# Altium PCB Ellis Huber Wearable device_CPU.PcbDoc (part 3 of 3)
Units mm, origin at the board's own origin, x right, y up, seen from the top; angles counter-clockwise.
Board outline 45 x 35 mm, 4 copper layers (Top Layer, Ground, Power, Bottom Layer), stack 1.586 mm thick; 117 components, 85 nets, 387 pads, 159 vias.
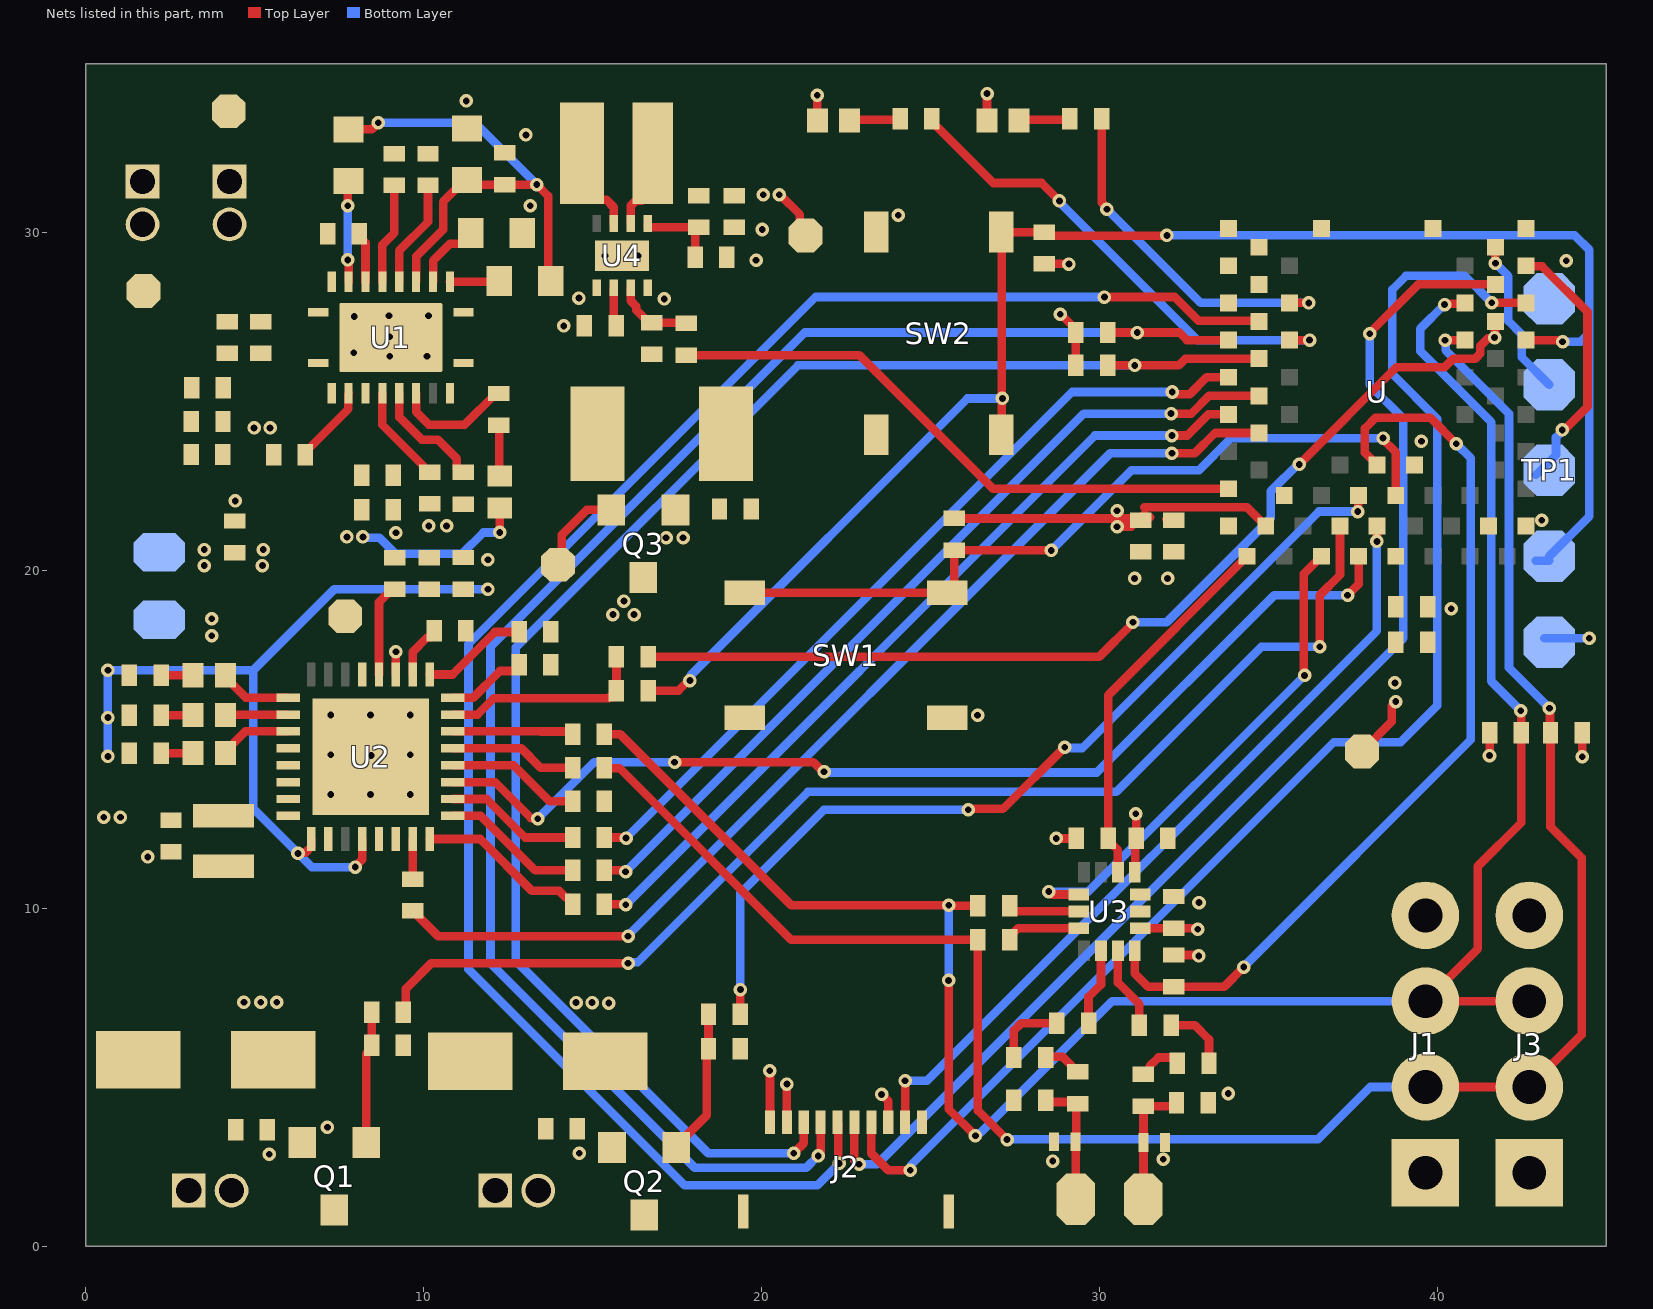
[diagram p4: the nets of this part, all layers, seen from the top]

## Via types
v1: diameter 0.4, hole 0.2, Top Layer to Bottom Layer, tented both sides, 159 vias

## Nets (pads, with @x,y where several pads share a name; then routed paths per layer and width w, separated by ;. In a path a pad name is that pad's centre, name@x,y a point inside that pad or via, vN(x,y) a via of type N, cw(c..) or ccw(c..) an arc to the next point about the centre after c; other vN are vias at no path point)
+3V3: C15.2 C16.2 C17.2 C18.2 C27.2 C28.2 C31.2 J1.1 J2.1 J2.2 J3.1 L1.1 LED5.1 LED6.1 R4.2 R5.2 R6.2 R7.2 R10.2 R19.2 R37.2 R38.2 TP1.1 TP7.1 U2.32 U3.5 U3.8 U.17 U.65 | length 26.9
  Top Layer w0.254: J2.1@20.25,3.675 v1@20.25,5.2 ; J2.2@20.75,3.675 v1(20.75,4.8) ; LED6.1@21.65,33.325 v1(21.65,34.075) ; R10.2@25.7,21.545 31.257,21.545 31.287,21.576 31.5,21.576 31.367,21.442 31.083,21.442 30.941,21.3 v1(30.525,21.3) ; LED5.1@26.675,33.325 v1(26.675,34.125) ; R19.2@28.375,29.08 29.095,29.08 v1(29.1,29.075) ; v1@28.725,12.075 28.729,12.071 R5.2@29.321,12.071 ; v1@28.85,27.6 28.85,27.594 29.305,27.139 R38.2@29.305,27.05 R37.2@29.305,26.075 ; U3.8@31.049,11.072 31.069,11.093 31.069,12.057 C28.2@31.089,12.077 31.089,12.786 v1(31.075,12.8) ; U3.5@31.209,9.412 C27.2@32.196,9.414 ; C17.2@31.287,21.625 C17.2@31.337,21.675 ; 31.337,21.875 34.375,21.875 U.17@34.925,21.325 ; C15.2@31.975,21.52 C15.2@32.027,21.572 ; C27.2@32.196,9.414 32.889,9.414 v1@32.9,9.425 ; R4.2@32.2,8.622 32.922,8.622 v1@32.925,8.625 ; TP7.1@37.775,14.65 38.652,15.527 38.652,16.002 v1(38.775,16.125) ; v1(41.55,14.525) 41.555,14.53 R7.2@41.555,15.2 ; R6.2@44.295,15.2 44.295,14.505 v1@44.3,14.5
  Bottom Layer w0.254: TP1.1@43.17,18 v1(44.5,18)
  other v1: 20.246,5.196 32.943,8.594 32.911,9.385 28.727,12.073 0.525,12.7 1.019,12.703 44.298,14.491 38.75,16.675 30.525,21.776 28.841,27.59
BAT+: C30.2 Q3.3 TP3.1 U2.19 | length 0.7
  Top Layer w0.254: U2.19@9.175,16.925 v1(9.175,17.6)
  other v1: 15.6,18.7 16.225,18.7 15.925,19.1 3.5,20.15 5.225,20.15 3.5,20.625 5.25,20.625
CHG: R22.1 U1.7 | length 3.5
  Top Layer w0.254: U1.7@9.775,25.25 9.775,24.7 10.15,24.325 11.216,24.325 12.136,25.245 R22.1@12.225,25.245
GND: C4.1 C5.1 C13.1 C15.1 C16.1 C17.1 C18.1 C19.1 C20.1 C21.1 C22.1 C23.1 C24.1 C25.1 C26.1 C27.1 C28.1 C29.1 C30.1 C31.1 C32.1 CR1.1 CR2.1 J1.4 J2.10 J2.S1 J2.S2 J3.4 Q1.2 Q2.2 R3.1 R9.1 R13.1 R14.1 R16.1 R27.1 R39.1 R40.2 R41.1 R42.1 SW1.1 SW1.2 SW2.1 SW2.2 TP1.5 TP3.2 U1.1 U1.9 U1.10 U1.11 U1.20 U1.21 U2.2 U2.6 U2.28 U2.29 U2.30 U2.31 U2.33 U3.6 U3.7 U4.1 U4.4 U4.9 U.1 U.2 U.3 U.4 U.5 U.16 U.18 U.29 U.30 U.45 U.46 U.47 U.55
  other v1: 28.617,2.522 31.892,2.572 5.425,2.725 14.6,2.75 7.15,3.525 33.817,4.522 32.95,10.175 1.831,11.525 7.25,13.375 8.425,13.375 9.6,13.375 8.443,14.528 7.25,14.55 9.6,14.55 7.25,15.725 8.425,15.725 9.6,15.725 26.393,15.719 3.725,18.075 3.725,18.575 40.419,18.869 31.044,19.769 32.019,19.769 11.9,20.325 9.175,21.125 43.093,21.494 4.42,22.065 39.536,23.828 8.992,26.347 10.092,26.347 7.925,26.45 8.993,26.922 14.143,27.244 7.942,27.522 8.967,27.547 10.142,27.547 17.118,28.044 14.593,28.069 19.837,29.191 43.823,29.176 15.368,29.319 16.343,29.319 20.023,30.099 24.043,30.519 13.15,30.8 13.025,32.9 11.261,33.907
IMU2_CS: J2.5 U.6 | length 52.7
  Top Layer w0.254: J2.5@22.25,3.675 22.273,3.652 22.273,2.477 v1(22.3,2.45) ; v1(30.15,28.1) 32.235,28.1 32.935,27.4 34.7,27.4 U.6@34.725,27.375
  Bottom Layer w0.254: v1(22.3,2.45) 21.65,1.8 17.725,1.8 11.325,8.2 11.325,17.825 21.6,28.1 v1(30.15,28.1)
IMU2_INT1: J2.7 U.41 | length 41
  Top Layer w0.254: J2.7@23.25,3.675 23.25,2.75 23.75,2.25 v1(24.4,2.25) ; v1(41.617,27.931) 41.62,27.928 42.622,27.928 U.41@42.625,27.925
  Bottom Layer w0.254: v1(24.4,2.25) 24.428,2.278 24.428,2.407 36.946,14.925 38.925,14.925 40,16 40,24.5 38.675,25.825 38.675,28.327 39.074,28.727 40.821,28.727 v1(41.617,27.931)
IMU2_INT2: J2.6 U.42 | length 37.7
  Top Layer w0.254: J2.6@22.75,3.675 22.75,2.525 v1@22.9,2.375 ; v1@38.002,27.034 39.442,28.475 U.42@41.725,28.475
  Bottom Layer w0.254: v1(22.887,2.427) 23.427,2.427 39,18 39,24.5 38,25.5 v1@38,27
  other v1: 38.002,27.014
IMU2_SCL: J2.3 R37.1 U.8 | length 47.3
  Top Layer w0.254: v1(20.95,2.75) 21.25,3.05 J2.3@21.25,3.675 ; R37.1@30.245,26.075 32.35,26.075 32.55,26.275 U.8@34.725,26.275
  Bottom Layer w0.254: v1(20.95,2.75) 18.425,2.75 12.725,8.45 12.725,17.725 21.075,26.075 v1(31.05,26.075)
IMU2_SDA: J2.4 R38.1 U.7 | length 49.4
  Top Layer w0.254: v1(21.675,2.675) 21.675,2.715 21.75,2.79 J2.4@21.75,3.675 ; R38.1@30.245,27.05 32.37,27.05 32.595,26.825 U.7@33.825,26.825
  Bottom Layer w0.254: v1(21.675,2.675) 21.325,2.325 18.025,2.325 11.975,8.375 11.975,17.745 21.28,27.05 v1(31.125,27.05)
LED1: R23.2 U.49 | length 10.4
  Top Layer w0.254: R23.2@30.07,33.375 30.07,30.895 30.225,30.74 v1(30.225,30.7) ; U.49@35.625,27.925 v1(36.2,27.925)
  Bottom Layer w0.254: v1(30.225,30.7) 33,27.925 v1(36.2,27.925)
LED2: R24.2 U.50 | length 14.5
  Top Layer w0.254: R24.2@25.045,33.376 25.045,33.287 26.857,31.475 28.288,31.475 v1(28.819,30.944) ; U.50@35.625,26.825 v1(36.225,26.825)
  Bottom Layer w0.254: v1@28.85,30.875 32.9,26.825 v1(36.225,26.825)
MC3: J2.9 U.23 | length 23.8
  Top Layer w0.254: J2.9@24.25,3.675 v1(24.25,4.9) ; v1(38.217,20.863) 38.221,20.868 38.221,21.321 U.23@38.225,21.325
  Bottom Layer w0.254: v1(24.25,4.9) 24.9,4.9 38.217,18.217 v1(38.217,20.863)
NetC1_1: C1.1 C2.2 C3.1 C6.2 C7.1 C8.2 C9.2 C10.2 U1.2
  other v1: 10.15,21.325 10.675,21.325 4.975,24.225 5.45,24.225
NetC1_2: C1.2 U1.5 | length 3
  Top Layer w0.254: U1.5@8.775,25.25 8.775,24.316 9.99,23.1 9.99,23.016 10.092,22.915 C1.2@10.181,22.915
NetC2_1: C2.1 C6.1 C8.1 J4.2 J5.2 TP5.1
NetC3_2: C3.2 U1.6 | length 3.4
  Top Layer w0.254: U1.6@9.275,25.25 9.275,24.548 9.948,23.875 10.419,23.875 10.976,23.318 10.976,23.013 11.077,22.912 C3.2@11.166,22.912
NetC7_2: C7.2 U1.3 | length 2.4
  Top Layer w0.254: C7.2@6.495,23.425 6.495,23.514 7.768,24.787 7.768,25.243 U1.3@7.775,25.25
NetC9_1: C9.1 C10.1 C11.1 C12.1 C14.1 J4.1 J5.1 TP6.1 U1.19
NetC11_2: C11.2 U1.17 | length 1.5
  Top Layer w0.254: C11.2@8.095,29.975 8.095,29.886 8.275,29.706 U1.17@8.275,28.55
NetC12_2: C12.2 U1.15 | length 3.2
  Top Layer w0.254: U1.15@9.275,28.55 9.275,29.475 10.125,30.325 C12.2@10.125,31.405
NetC13_2: C13.2 R1.1 R12.1 R16.2 U1.14 | length 15.2
  Top Layer w0.254: R12.1@7.775,33.062 8.462,33.062 v1@8.65,33.25 ; U1.14@9.775,28.55 9.775,29.3 10.575,30.1 10.575,30.926 11.212,31.563 R16.2@11.275,31.563 11.408,31.43 C13.2@12.4,31.43 v1(13.345,31.43) 13.682,31.093 13.682,28.655 R1.1@13.762,28.575
  Bottom Layer w0.254: v1(8.656,33.259) 11.516,33.259 v1(13.345,31.43)
NetC14_2: C14.2 U1.16 | length 3
  Top Layer w0.254: U1.16@8.775,28.55 8.775,29.65 9.125,30 C14.2@9.125,31.405
NetC20_2: C20.2 CR1.2 R15.1 TP2.2 | length 3.9
  Top Layer w0.254: C20.2@28.41,4.318 28.458,4.27 29.313,4.27 R15.1@29.362,4.222 29.319,4.179 29.319,3.119 CR1.2@29.293,3.093 29.299,3.088 29.299,1.395 TP2.2@29.304,1.389 ; TP2.2@29.346,2.004 TP2.2@29.35,2
NetC21_2: C21.2 CR2.2 R29.1 TP2.1 | length 3.8
  Top Layer w0.254: TP2.1@31.304,1.389 31.306,1.391 31.306,3.066 CR2.2@31.308,3.068 31.306,3.07 31.306,4.145 R29.1@31.304,4.147 32.183,4.147 C21.2@32.284,4.249 ; TP2.1@31.35,2 TP2.1@31.354,2.004
NetC23_2: C23.2 D4.1 Q3.2 TP8.1 U4.2 | length 3.8
  Top Layer w0.254: TP8.1@13.975,20.175 14.085,20.285 14.085,21.056 14.829,21.8 Q3.2@15.55,21.8 ; C23.2@15.62,27.25 15.623,27.253 15.623,28.373 U4.2@15.625,28.375
NetC32_2: C32.2 U2.12 | length 4
  Top Layer w0.254: U2.12@10.86,14.24 12.66,14.24 13.725,13.175 C32.2@14.405,13.175
NetD1_2: D1.2 J7.1 Q1.3
NetD2_2: D2.2 J6.1 Q2.3
NetL1_2: L1.2 U2.5
NetL2_1: L2.1 U4.7 | length 2.6
  Top Layer w0.254: L2.1@14.679,32.358 14.679,31.508 15.202,30.985 15.4,30.985 15.625,30.76 U4.7@15.625,30.275
NetLED1_1: LED1.1 R31.1 | length 1
  Top Layer w0.254: R31.1@2.225,16.9 LED1.1@3.175,16.9
NetLED1_2: LED1.2 U2.25 | length 2.2
  Top Layer w0.254: LED1.2@4.125,16.9 4.125,16.85 4.735,16.24 U2.25@5.99,16.24
NetLED2_1: LED2.1 R32.1 | length 1
  Top Layer w0.254: R32.1@2.225,15.725 LED2.1@3.175,15.725
NetLED2_2: LED2.2 U2.26 | length 1.9
  Top Layer w0.254: LED2.2@4.125,15.725 4.138,15.738 5.988,15.738 U2.26@5.99,15.74
NetLED3_1: LED3.1 R33.1 | length 1
  Top Layer w0.254: R33.1@2.225,14.6 LED3.1@3.175,14.6
NetLED3_2: LED3.2 U2.27 | length 2.2
  Top Layer w0.254: LED3.2@4.125,14.6 4.125,14.65 4.715,15.24 U2.27@5.99,15.24
NetLED5_2: LED5.2 R23.1 | length 1.5
  Top Layer w0.254: LED5.2@27.625,33.325 27.65,33.35 29.105,33.35 R23.1@29.13,33.375
NetLED6_2: LED6.2 R24.1 | length 1.5
  Top Layer w0.254: LED6.2@22.6,33.325 22.625,33.35 24.08,33.35 R24.1@24.105,33.376
NetLED7_2: LED7.2 R22.2 | length 1.5
  Top Layer w0.254: R22.2@12.225,24.305 12.238,24.293 12.238,22.813 LED7.2@12.25,22.8
NetQ1_1: Q1.1 R8.1 R9.2 | length 3.9
  Top Layer w0.254: Q1.1@8.3,3.075 8.3,5.703 8.455,5.859 R9.2@8.455,5.948 R8.1@8.455,6.923
NetQ2_1: Q2.1 R2.1 R3.2 | length 4.3
  Top Layer w0.254: Q2.1@17.475,2.925 17.475,2.975 18.375,3.875 18.375,5.795 R3.2@18.43,5.85 R2.1@18.43,6.87
NetR1_2: R1.2 U1.12 | length 1.5
  Top Layer w0.254: U1.12@10.775,28.55 12.213,28.55 R1.2@12.238,28.575
NetR2_2: R2.2 U.22 | length 27
  Top Layer w0.254: R2.2@19.37,6.87 19.372,6.873 19.372,7.597 v1(19.375,7.6) ; v1(26.119,12.919) 26.147,12.947 27.147,12.947 v1(28.975,14.775) ; v1(37.65,21.75) 37.663,21.762 37.663,22.212 U.22@37.675,22.225
  Bottom Layer w0.254: v1(19.375,7.6) 19.375,10.45 21.844,12.919 v1(26.119,12.919) ; v1(28.975,14.775) 29,14.75 29.5,14.75 36.5,21.75 v1(37.65,21.75)
NetR4_1: R4.1 U3.4 U.54 | length 27.2
  Top Layer w0.254: U3.4@31.049,8.752 31.049,8.076 31.442,7.683 R4.1@32.2,7.683 33.695,7.683 v1(34.276,8.263) ; U.54@38.225,23.125 37.861,23.489 37.861,24.211 38.175,24.525 39.8,24.525 v1@40.575,23.75
  Bottom Layer w0.254: v1@34.275,8.275 41,15 41,23.327 v1(40.569,23.758)
NetR5_1: R5.1 U3.9 U.61 | length 11.2
  Top Layer w0.254: U3.9@30.549,11.072 30.549,11.732 30.4,11.881 30.362,11.881 30.26,11.983 R5.1@30.26,12.071 30.26,16.31 U.61@34.375,20.425
NetR8_2: R8.2 U.21 | length 35.8
  Top Layer w0.254: R8.2@9.395,6.923 9.471,6.998 9.471,7.621 10.225,8.375 v1(16.05,8.375) ; v1(36.525,17.75) 36.525,19.275 37.125,19.875 U.21@37.125,21.325 U.21@37.135,21.315
  Bottom Layer w0.254: v1(16.05,8.375) 16.078,8.403 16.328,8.403 21.375,13.45 30.5,13.45 34.8,17.75 v1(36.525,17.75)
NetR10_1: R10.1 SW1.3 SW1.4 U.24 | length 23.3
  Top Layer w0.254: SW1.4@19.5,19.35 SW1.3@25.5,19.35 25.7,19.55 R10.1@25.7,20.605 25.703,20.603 28.572,20.603 v1(28.575,20.6) ; v1(38.4,23.925) 38.4,23.885 38.775,23.51 U.24@38.775,22.225
  Bottom Layer w0.254: v1(28.575,20.6) 30.95,22.975 32.95,22.975 33.9,23.925 v1(38.4,23.925)
NetR11_1: R11.1 U.40 | length 30
  Top Layer w0.254: R11.1@16.645,17.45 30,17.45 v1@31,18.45 ; v1(35.918,23.144) 38.799,26.025 40.225,26.025 40.475,26.275 41.125,26.275 41.275,26.425 41.275,26.65 41.497,26.872 41.672,26.872 v1(41.7,26.9) 41.712,26.912 41.712,27.362 U.40@41.725,27.375
  Bottom Layer w0.254: v1(30.993,18.469) 31.994,18.469 35.075,21.55 35.075,22.35 v1@35.9,23.175
NetR12_2: R12.2 U1.18 | length 3
  Top Layer w0.254: v1(7.749,30.801) 7.749,31.512 R12.2@7.775,31.538 ; v1(7.75,29.2) 7.775,29.175 U1.18@7.775,28.55
  Bottom Layer w0.254: v1(7.75,29.2) v1(7.749,30.801)
NetR13_2: R13.2 U1.13 | length 2.1
  Top Layer w0.254: U1.13@10.275,28.55 10.275,29.175 10.783,29.683 11.134,29.683 11.388,29.937 R13.2@11.388,30
NetR14_2: R14.2 U2.16 | length 2.4
  Top Layer w0.254: U2.16@10.86,16.24 11.465,16.24 12.254,17.029 12.721,17.029 12.823,17.13 R14.2@12.823,17.219
NetR15_2: R15.2 R20.1 | length 1.2
  Top Layer w0.254: R20.1@28.427,5.605 28.918,5.605 29.171,5.352 29.171,5.263 29.273,5.162 R15.2@29.362,5.162
NetR17_1: R17.1 U.12 | length 31.5
  Top Layer w0.254: R17.1@9.675,9.93 10.43,9.175 v1(16.05,9.175) ; v1(32.15,23.475) 32.825,23.475 33.425,24.075 U.12@34.725,24.075
  Bottom Layer w0.254: v1(16.05,9.175) 16.05,9.2 30.325,23.475 v1(32.15,23.475)
NetR17_2: R17.2 U2.7 | length 1.2
  Top Layer w0.254: R17.2@9.675,10.87 U2.7@9.675,12.055
NetR18_1: R18.1 U.11 | length 24.5
  Top Layer w0.254: R18.1@15.345,10.125 v1@15.975,10.125 ; v1(32.15,24) 32.6,24 33.225,24.625 U.11@33.825,24.625
  Bottom Layer w0.254: v1(15.979,10.11) 29.869,24 v1(32.15,24)
NetR18_2: R18.2 U2.8 | length 5.1
  Top Layer w0.254: U2.8@10.175,12.055 11.67,12.055 13.2,10.525 14.005,10.525 14.215,10.316 14.304,10.316 14.405,10.214 R18.2@14.405,10.125
NetR20_2: R20.2 R28.1 | length 2.2
  Top Layer w0.254: R20.2@27.47,5.588 27.47,6.388 27.686,6.604 R28.1@28.74,6.604
NetR21_1: R21.1 R39.2 U4.5 | length 2.6
  Top Layer w0.254: U4.5@16.625,30.275 16.625,30.164 16.627,30.162 R21.1@18.134,30.162 ; R39.2@18.032,29.279 18.032,30.061 R21.1@18.134,30.162 ; R21.1@18.138,30.162 R21.1@18.134,30.162
NetR26_1: R26.1 U.10 | length 25.2
  Top Layer w0.254: R26.1@15.345,11.125 15.95,11.125 v1@15.975,11.1 ; v1(32.125,24.65) 32.725,24.65 33.25,25.175 U.10@34.725,25.175
  Bottom Layer w0.254: v1(15.975,11.084) 29.541,24.65 v1(32.125,24.65)
NetR26_2: R26.2 U2.9 | length 4.2
  Top Layer w0.254: U2.9@10.86,12.74 11.685,12.74 13.3,11.125 R26.2@14.38,11.125
NetR28_2: R28.2 U3.2 | length 2.3
  Top Layer w0.254: R28.2@29.68,6.604 29.68,7.38 30.049,7.749 U3.2@30.049,8.752
NetR29_2: R29.2 R45.1 | length 1.4
  Top Layer w0.254: R29.2@31.304,5.087 31.393,5.087 31.495,5.188 31.495,5.333 31.75,5.588 32.205,5.588 32.307,5.486 R45.1@32.307,5.417
NetR30_1: R30.1 U.15 | length 17.7
  Top Layer w0.254: R30.1@17.77,26.381 22.895,26.381 26.851,22.425 U.15@33.825,22.425
NetR30_2: R30.2 R40.1 U4.3 | length 2.4
  Top Layer w0.254: U4.3@16.125,28.375 16.127,28.373 16.127,27.989 16.293,27.822 16.293,27.713 16.661,27.345 R40.1@16.75,27.345 ; R40.1@16.762,27.333 17.758,27.333 R30.2@17.77,27.321
NetR34_2: R34.2 U2.14 | length 3.6
  Top Layer w0.254: U2.14@10.86,15.24 13.46,15.24 13.463,15.237 14.32,15.237 R34.2@14.398,15.16
NetR35_2: R35.2 U2.13 | length 3.8
  Top Layer w0.254: U2.13@10.86,14.74 12.885,14.74 13.458,14.167 R35.2@14.398,14.167
NetR36_1: R36.1 U.9 | length 24.1
  Top Layer w0.254: R36.1@15.345,12.1 v1@16,12.1 ; v1@32.2,25.225 32.675,25.225 33.175,25.725 U.9@33.825,25.725
  Bottom Layer w0.254: v1(15.988,12.084) 29.193,25.289 v1(32.158,25.289)
NetR36_2: R36.2 U2.10 | length 4
  Top Layer w0.254: U2.10@10.86,13.24 11.86,13.24 13,12.1 R36.2@14.38,12.1
NetR41_2: R41.2 U2.18 | length 1.6
  Top Layer w0.254: U2.18@9.675,16.925 9.675,17.595 10.115,18.035 10.203,18.035 10.305,18.136 R41.2@10.305,18.225
NetR42_2: R42.2 U2.17 | length 3.2
  Top Layer w0.254: U2.17@10.175,16.925 10.85,16.925 12.11,18.185 R42.2@12.823,18.185
NetR43_2: R43.2 U3.14 | length 2.2
  Top Layer w0.254: R43.2@27.345,9.075 27.345,9.164 27.593,9.412 U3.14@29.389,9.412
NetR44_2: R44.2 U3.13 | length 2.1
  Top Layer w0.254: R44.2@27.345,10.075 27.345,10.014 27.447,9.912 U3.13@29.389,9.912
NetR45_2: R45.2 R46.1 | length 2
  Top Layer w0.254: R46.1@32.127,6.542 32.828,6.542 33.247,6.123 R45.2@33.247,5.417
NetR46_2: R46.2 U3.3 | length 2.5
  Top Layer w0.254: U3.3@30.549,8.752 30.549,7.805 31.187,7.167 R46.2@31.187,6.542
NetTP1_3: TP1.3 U.43 | length 7.9
  Top Layer w0.254: U.43@42.625,29.025 42.642,29.008 43.107,29.008 44.45,27.665 44.45,24.85 v1@43.725,24.125
  Bottom Layer w0.254: TP1.3@42.925,22.835 43.518,23.428 43.518,23.941 43.704,24.127 v1(43.704,24.167)
NetTP1_4: TP1.4 U.44 | length 4.7
  Top Layer w0.254: v1(41.725,29.1) U.44@41.725,29.575
  Bottom Layer w0.254: v1(41.725,29.1) 42.111,28.714 42.111,27.389 42.5,27 42.5,26.325 TP1.4@43.32,25.505
NetU2_11: U2.11 U.64 | length 31.2
  Top Layer w0.254: U2.11@10.86,13.74 12.11,13.74 13.175,12.675 v1@13.375,12.675 ; v1(17.425,14.325) 21.535,14.325 21.81,14.05 v1(21.85,14.05) ; v1(37.35,19.275) 37.675,19.6 U.64@37.675,20.425
  Bottom Layer w0.254: v1(13.375,12.659) 15.041,14.325 v1(17.425,14.325) ; v1(21.85,14.05) 21.875,14.025 29.925,14.025 35.175,19.275 v1(37.35,19.275)
NetU3_12: U3.12 U.63 | length 14.9
  Top Layer w0.254: v1(28.5,10.5) 28.54,10.5 28.627,10.412 U3.12@29.389,10.412 ; v1(36.074,16.899) 36.05,16.923 36.05,19.9 U.63@36.575,20.425
  Bottom Layer w0.254: v1(28.5,10.5) 29.675,10.5 v1(36.074,16.899)
NPM_RST: R11.2 R25.1 U2.15 | length 6.2
  Top Layer w0.254: U2.15@10.86,15.74 11.59,15.74 12.077,16.227 15.482,16.227 15.515,16.259 15.604,16.259 15.705,16.361 R25.1@15.705,16.45 R11.2@15.705,17.45
RST: R19.1 R25.2 SW2.3 SW2.4 TP1.2 U.39 | length 49.7
  Top Layer w0.254: R25.2@16.645,16.45 17.544,16.45 17.839,16.745 v1(17.879,16.745) ; SW2.3@27.1,24.025 27.116,24.041 27.116,25.081 v1(27.132,25.097) 27.116,25.113 27.116,30.009 SW2.4@27.105,30.02 ; SW2.4@27.1,30.025 SW2.4@27.105,30.02 ; v1(32,29.925) 31.993,29.918 28.477,29.918 R19.1@28.375,30.02 SW2.4@27.105,30.02 ; U.39@42.625,26.825 43.624,26.825 43.673,26.777 v1(43.712,26.777)
  Bottom Layer w0.254: v1(17.879,16.745) 17.907,16.773 17.907,16.907 26.097,25.097 v1(27.132,25.097) ; v1(32,29.925) 44.075,29.925 44.5,29.5 44.5,27.028 ; TP1.2@42.925,20.295 TP1.2@43.32,20.295 ; TP1.2@43.32,20.425 44.5,21.605 44.5,27.028 ; v1(43.712,26.777) 44.248,26.777 44.5,27.028
SCL: J1.3 J3.3 R7.1 R34.1 R44.1 U.59 | length 62.3
  Top Layer w0.254: R34.1@15.345,15.16 15.815,15.16 20.881,10.094 v1(25.543,10.094) ; v1(25.538,7.868) 25.538,4.064 v1(26.333,3.269) ; v1@25.543,10.075 R44.1@26.405,10.075 ; v1(40.221,27.879) 40.244,27.902 40.802,27.902 U.59@40.825,27.925 ; v1(42.475,15.85) 42.485,15.84 42.485,15.21 R7.1@42.495,15.2 42.495,12.545 41.2,11.25 41.2,8.802 J1.3@39.653,7.255 J3.3@42.727,7.255
  Bottom Layer w0.254: v1(25.543,10.094) 25.543,7.882 v1@25.55,7.875 ; v1(26.333,3.269) 26.373,3.269 26.446,3.342 26.463,3.342 30.376,7.255 J1.3@39.653,7.255 ; v1(40.221,27.879) 39.5,27.158 39.5,26.5 41.601,24.399 41.601,16.724 v1(42.475,15.85)
SDA: J1.2 J3.2 R6.1 R35.1 R43.1 U.58 | length 60.6
  Top Layer w0.254: R35.1@15.345,14.167 15.423,14.167 15.447,14.144 15.806,14.144 20.875,9.075 R43.1@26.405,9.075 26.405,4.019 v1(27.267,3.157) ; J1.2@39.653,4.715 J3.2@42.727,4.715 44.275,6.263 44.275,11.5 43.355,12.42 R6.1@43.355,15.2 43.34,15.215 43.34,15.91 v1(43.325,15.925) ; v1(40.235,26.824) U.58@40.825,26.825
  Bottom Layer w0.254: v1@27.276,3.166 36.472,3.166 38.021,4.715 J1.2@39.653,4.715 ; v1(40.235,26.824) 40.249,26.81 40.249,26.525 42.126,24.648 42.126,17.124 v1(43.325,15.925)
VOS: C19.2 C22.2 C29.2 D1.1 D2.1 J2.8 J6.2 J7.2 L2.2 R21.2 TP9.1 U4.6 | length 4.9
  Top Layer w0.254: U4.6@16.125,30.275 16.125,30.803 16.274,30.952 16.452,30.952 16.779,31.279 L2.2@16.779,32.358 ; v1(20.522,31.127) 20.548,31.127 21.135,30.54 21.135,30.09 TP9.1@21.3,29.925 ; v1@23.525,4.525 23.75,4.3 J2.8@23.75,3.675
  other v1: 23.552,4.495 15.475,7.2 4.675,7.225 5.175,7.225 5.65,7.225 14.509,7.212 14.984,7.212 20.047,31.127
VSYS: C24.2 C25.2 C26.2 R31.2 R32.2 R33.2 U2.1 U2.4 U2.20 | length 27
  Top Layer w0.254: v1@6.25,11.65 6.491,11.65 6.675,11.834 U2.1@6.675,12.055 ; v1(7.975,11.225) 7.975,11.241 8.175,11.441 U2.4@8.175,12.055 ; U2.20@8.675,16.925 8.675,19.065 9.054,19.444 C24.2@9.143,19.444
  Bottom Layer w0.254: v1(0.65,14.5) v1(0.65,15.65) v1(0.65,17.05) 4.95,17.05 ; v1@7.961,11.225 6.681,11.225 4.95,12.956 4.95,17.05 ; v1(11.9,19.45) 7.35,19.45 4.95,17.05
  other v1: 6.277,11.629
W_Power: C4.2 C5.2 D4.2 LED7.1 Q3.1 R27.2 TP4.1 U1.4 U2.21 | length 5.2
  Top Layer w0.254: v1(12.25,21.131) LED7.1@12.25,21.85
  Bottom Layer w0.254: v1(8.2,21) 8.228,20.972 8.686,20.972 9.158,20.5 11.136,20.5 11.767,21.131 v1(12.25,21.131)
  other v1: 17.175,20.975 17.675,20.975 7.725,21
pads on no net: U1.8 U2.3 U2.22 U2.23 U2.24 U3.1 U3.10 U3.11 U4.8 U.13 U.14 U.19 U.20 U.25 U.26 U.27 U.28 U.31 U.32 U.33 U.34 U.35 U.36 U.37 U.38 U.48 U.51 U.52 U.53 U.56 U.57 U.60 U.62 U.66 U.67 U.68

## Polygon pours and split planes (outlines as drawn)
GND on Top Layer "NONET_L-01_P-001" (solid, pour order 21): 0,0 0,0.001 0,35 45,35 45,0
VOS on Top Layer "NONET_L-01_P-001" (solid, pour order 17): 3.75,1.178 4.825,1.178 4.825,2.725 4.65,2.9 4.65,4.25 4.725,4.325 6.804,4.325 7.175,4.696 7.175,7.25 6.875,7.55 4.5,7.55 4.15,7.2 4.15,4.875 4.15,3.004 3.75,2.7
VOS on Top Layer "NONET_L-01_P-001" (solid, pour order 16): 13.4,1.15 13.403,1.153 14.025,1.153 14.025,2.325 13.829,2.521 13.829,4.054 14.075,4.3 16.604,4.3 16.975,4.671 16.975,7.225 16.675,7.525 14.3,7.525 14,7.225 14,4.9 13.375,4.275 13.375,2.525 13.186,2.376 12.875,2.163 12.875,1.15 13.35,1.15
W_Power on Top Layer "NONET_L-01_P-001" (solid, pour order 10): 16.75,22.425 16.975,22.65 18.05,22.65 18.05,25.7 20.025,25.7 20.025,22.775 19.75,22.5 18.975,22.5 18.975,20.95 18.775,20.75 16.975,20.75 16.75,20.975
NetL1_2 on Top Layer "NONET_L-01_P-001" (solid, pour order 7): 3.175,11.597 3.175,10.45 3.375,10.25 8.375,10.25 8.798,10.673 8.798,12.404 8.797,12.405 8.551,12.405 8.551,11.126 8.15,10.725 5.835,10.725 4.96,11.6 3.178,11.6 3.175,11.597
+3V3 on Top Layer "NONET_L-01_P-001" (solid, pour order 6): 6.333,12.865 5.765,12.865 5.2,12.86 4.96,13.1 0.35,13.1 0.15,12.9 0.15,12.475 0.35,12.275 4.85,12.275 5.2,12.615 5.21,12.615 6.339,12.615 6.341,12.617 6.341,12.865
W_Power on Top Layer "NONET_L-01_P-001" (solid, pour order 4): 8.298,16.573 8.301,16.576 8.301,20.493 8.389,20.581 8.4,20.592 8.4,21 7.125,21 7.125,18.3 8.05,17.375 8.05,16.576 8.05,16.575 8.053,16.572 8.298,16.572
W_Power on Top Layer "NONET_L-01_P-001" (solid, pour order 3): 8.153,25.551 8.394,25.551 8.395,25.552 8.4,25.547 8.4,20.65 8.35,20.6 7.6,20.6 7.475,20.725 7.476,20.726 7.476,23.906 7.486,23.906 8.154,24.574 8.154,25.376 8.155,25.377
NetC9_1 on Top Layer "NONET_L-01_P-001" (solid, pour order 2): 8.797,32.116 10.444,32.116 10.425,32.136 10.425,34.575 10.275,34.725 4.325,34.725 4.175,34.575 4.175,34.15 4.3,34.025 9.475,34.025 9.8,33.7 9.8,32.575 8.8,32.575 8.797,32.572
NetC2_1 on Top Layer "NONET_L-01_P-001" (solid, pour order 1): 1.675,30.75 4.8,30.75 4.925,30.625 4.925,29.175 4.75,29 3.5,29 3.05,28.55 3.05,26.125 3.375,25.8 3.375,22.875 3.325,22.825 0.45,22.825 0.275,23 0.275,30.625 0.4,30.75 1.675,30.75
NetC9_1 on Top Layer "NONET_L-01_P-001" (solid, pour order 0): 1.31,31.019 0.481,31.019 0.25,31.25 0.25,34.5 0.6,34.85 5.975,34.85 6.4,34.425 6.4,30.525 6.626,30.299 7.383,30.299 7.383,29.645 7.383,29.644 6.897,29.644 6.897,28.928 6.979,28.846 7.389,28.846 7.389,28.25 7.388,28.248 5.698,28.248 5.5,28.05 5.5,27.125 3.625,27.125 3.625,28.357 3.868,28.6 5.2,28.6 5.375,28.775 5.375,30.85 5.2,31.025 5.194,31.019
W_Power on Power "NONET_L-01_P-001" (solid, pour order 22): 17.955,20.75 17.957,20.752 17.957,23.049 17.93,23.076 17.93,23.075 7.475,23.075 7.475,20.15 7.75,19.875 13.225,19.875 14.125,20.775 14.15,20.75 17.955,20.75
+3V3 on Power "NONET_L-01_P-001" (solid, pour order 12): 0.25,12.275 4.025,12.275 4.475,12.725 4.475,23.575 12.75,31.85 26.9,31.85 28.175,30.575 28.175,4.425 26.575,2.825 21.775,2.825 21.1,3.5 21.1,6.175 17.525,6.175 17.575,6.125 17.575,1.175 18.55,0.2 44.825,0.2 44.85,0.225 44.8,0.275 44.8,34.825 0.2,34.825 0.15,34.775 0.25,34.675
VOS on Power "NONET_L-01_P-001" (solid, pour order 19): 22.1,6.775 22.1,4.4 22.825,3.675 25.725,3.675 27.05,5 27.05,30.125 25.75,31.425 19.425,31.425 18.95,30.95 18.95,15.575 14.425,11.05 0.075,11.05 0.075,2.65 0.05,2.625 16.1,2.625 16.7,3.225 16.7,6.75 17.5,7.55 21.325,7.55
BAT+ on Power "NONET_L-01_P-001" (solid, pour order 8): 17.075,17.35 17.075,19.5 15.325,19.5 15.325,18.3 15.1,18.075 15.1,17.35
BAT+ on Power "NONET_L-01_P-001" (solid, pour order 5): 17.075,17.35 5.275,17.35 4.95,17.675 4.95,20.9 5.125,20.9 5.875,20.9 5.875,18.425 6.225,18.075 17.075,18.075
GND on Ground "NONET_L-01_P-001" (solid, pour order 9): 0,35 0.015,35 45,35 45,0 0,0
GND on Bottom Layer "NONET_L-01_P-001" (solid, pour order 20): 0,0 0,0.001 0,35 45,35 45,0

## Other copper
Top Layer:
  rectangle net NetD2_2: 15.8,0.254 17.85,1.6
  rectangle net GND: 14.325,2.475 16.525,3.775
  rectangle net GND: 5.15,2.475 7.425,3.775
  rectangle net NetC1_1: 4.575,24.95 7.4,25.55
  rectangle net +3V3: 30.25,21.15 32.75,22.001
  rectangle net GND: 39.5,17.525 40.75,19.25
  rectangle net +3V3: 38.525,15.825 39.025,20.675
  rectangle net GND: 30.675,19.5 32.325,20.8
  rectangle net NetD2_2: 10.125,0.255 17.85,0.9
  rectangle net NetD1_2: 6.675,0.259 8.6,1.775
  rectangle net NetD1_2: 0.3,0.261 8.6,0.875
  rectangle net NetD1_2: 0.3,0.271 3.55,6.35
  rectangle net NetD2_2: 10.125,0.255 12.7,6.35
  rectangle net BAT+: 15.425,18.425 16.9,20.275
  rectangle net NetC23_2: 14.35,21.321 15.95,26.225
  rectangle net NetC23_2: 15.35,21.325 15.95,27.575
  rectangle net VOS: 16.325,30.825 20.85,33.85
  rectangle net BAT+: 3.2,19.925 5.525,20.85
  rectangle net VSYS: 0.375,14.1 1.5,17.4
  rectangle net GND: 8.825,20.1 12.175,20.6
  rectangle net VSYS: 8.825,19.2 12.2,19.675
  rectangle net GND: 8.875,20.151 9.5,23.125
  rectangle net NetC1_1: 3.875,23.1 5.775,26.65
  rectangle net NetC1_1: 9.875,21.025 11.5,22.2
Bottom Layer:
  rectangle net GND: 1.15,17.8 4.275,19.175
  rectangle net BAT+: 1.15,19.925 3.95,21.275
  rectangle net NetC1_1: 4.75,23.375 10.875,24.5
  rectangle net NetC1_1: 9.875,21.025 10.875,24.5

## Silkscreen, mask and mechanical layers (free items; w line width, h text height)
Top Overlay:
  text "C1" at 0.976,33.029 h1.5
  text "LED1" at 21.175,31.354 h1.5
  text "LED2" at 26.2,31.354 h1.5
  text "C2" at 0.385,26.109 h1.5
  text "WP" at 4.451,18.054 h1.5
  text "3V3" at 33.713,14.072 h1.5
  text "GND" at 34.779,9.158 h1.5
  text "SCL" at 34.779,6.508 h1.5
  text "SDA" at 34.754,4.083 h1.5
  text "3V3" at 34.779,1.408 h1.5
  text "Q2" at 26.571,0.777 h1.5
  text "Q1" at 32.189,0.795 h1.5
Bottom Overlay:
  text "COIL" at 5.488,32.354 h1.5
  text "GND" at 41.646,27.365 h1.5
  text "DIO" at 41.646,24.825 h1.5
  text "CLK" at 41.646,22.225 h1.5
  text "B+" at 3.045,21.404 h1.5
  text "RST" at 41.646,19.825 h1.5
  text "3V3" at 41.646,17.225 h1.5
  text "B-" at 3.123,16.433 h1.5
  text "M+" at 16.048,1.029 h1.5
  text "M-" at 2.27,1.004 h1.5
  text "M+" at 6.995,1.004 h1.5
  text "M-" at 11.323,1.004 h1.5

## Dimensions
45,35 to 0,35 on Top Overlay
45,35 to 45,0 on Top Overlay